# Altium PCB 1700-0003_PowerBoard_REV-A.PcbDoc (part 2 of 2)
Units mil, origin at the board's own origin, x right, y up, seen from the top; angles counter-clockwise.
Board outline 4000 x 3250 mil, 4 copper layers (Top, GND+Signal, PWR+Signal, Bottom), stack 69.687 mil thick; 205 components, 103 nets, 571 pads, 228 vias.
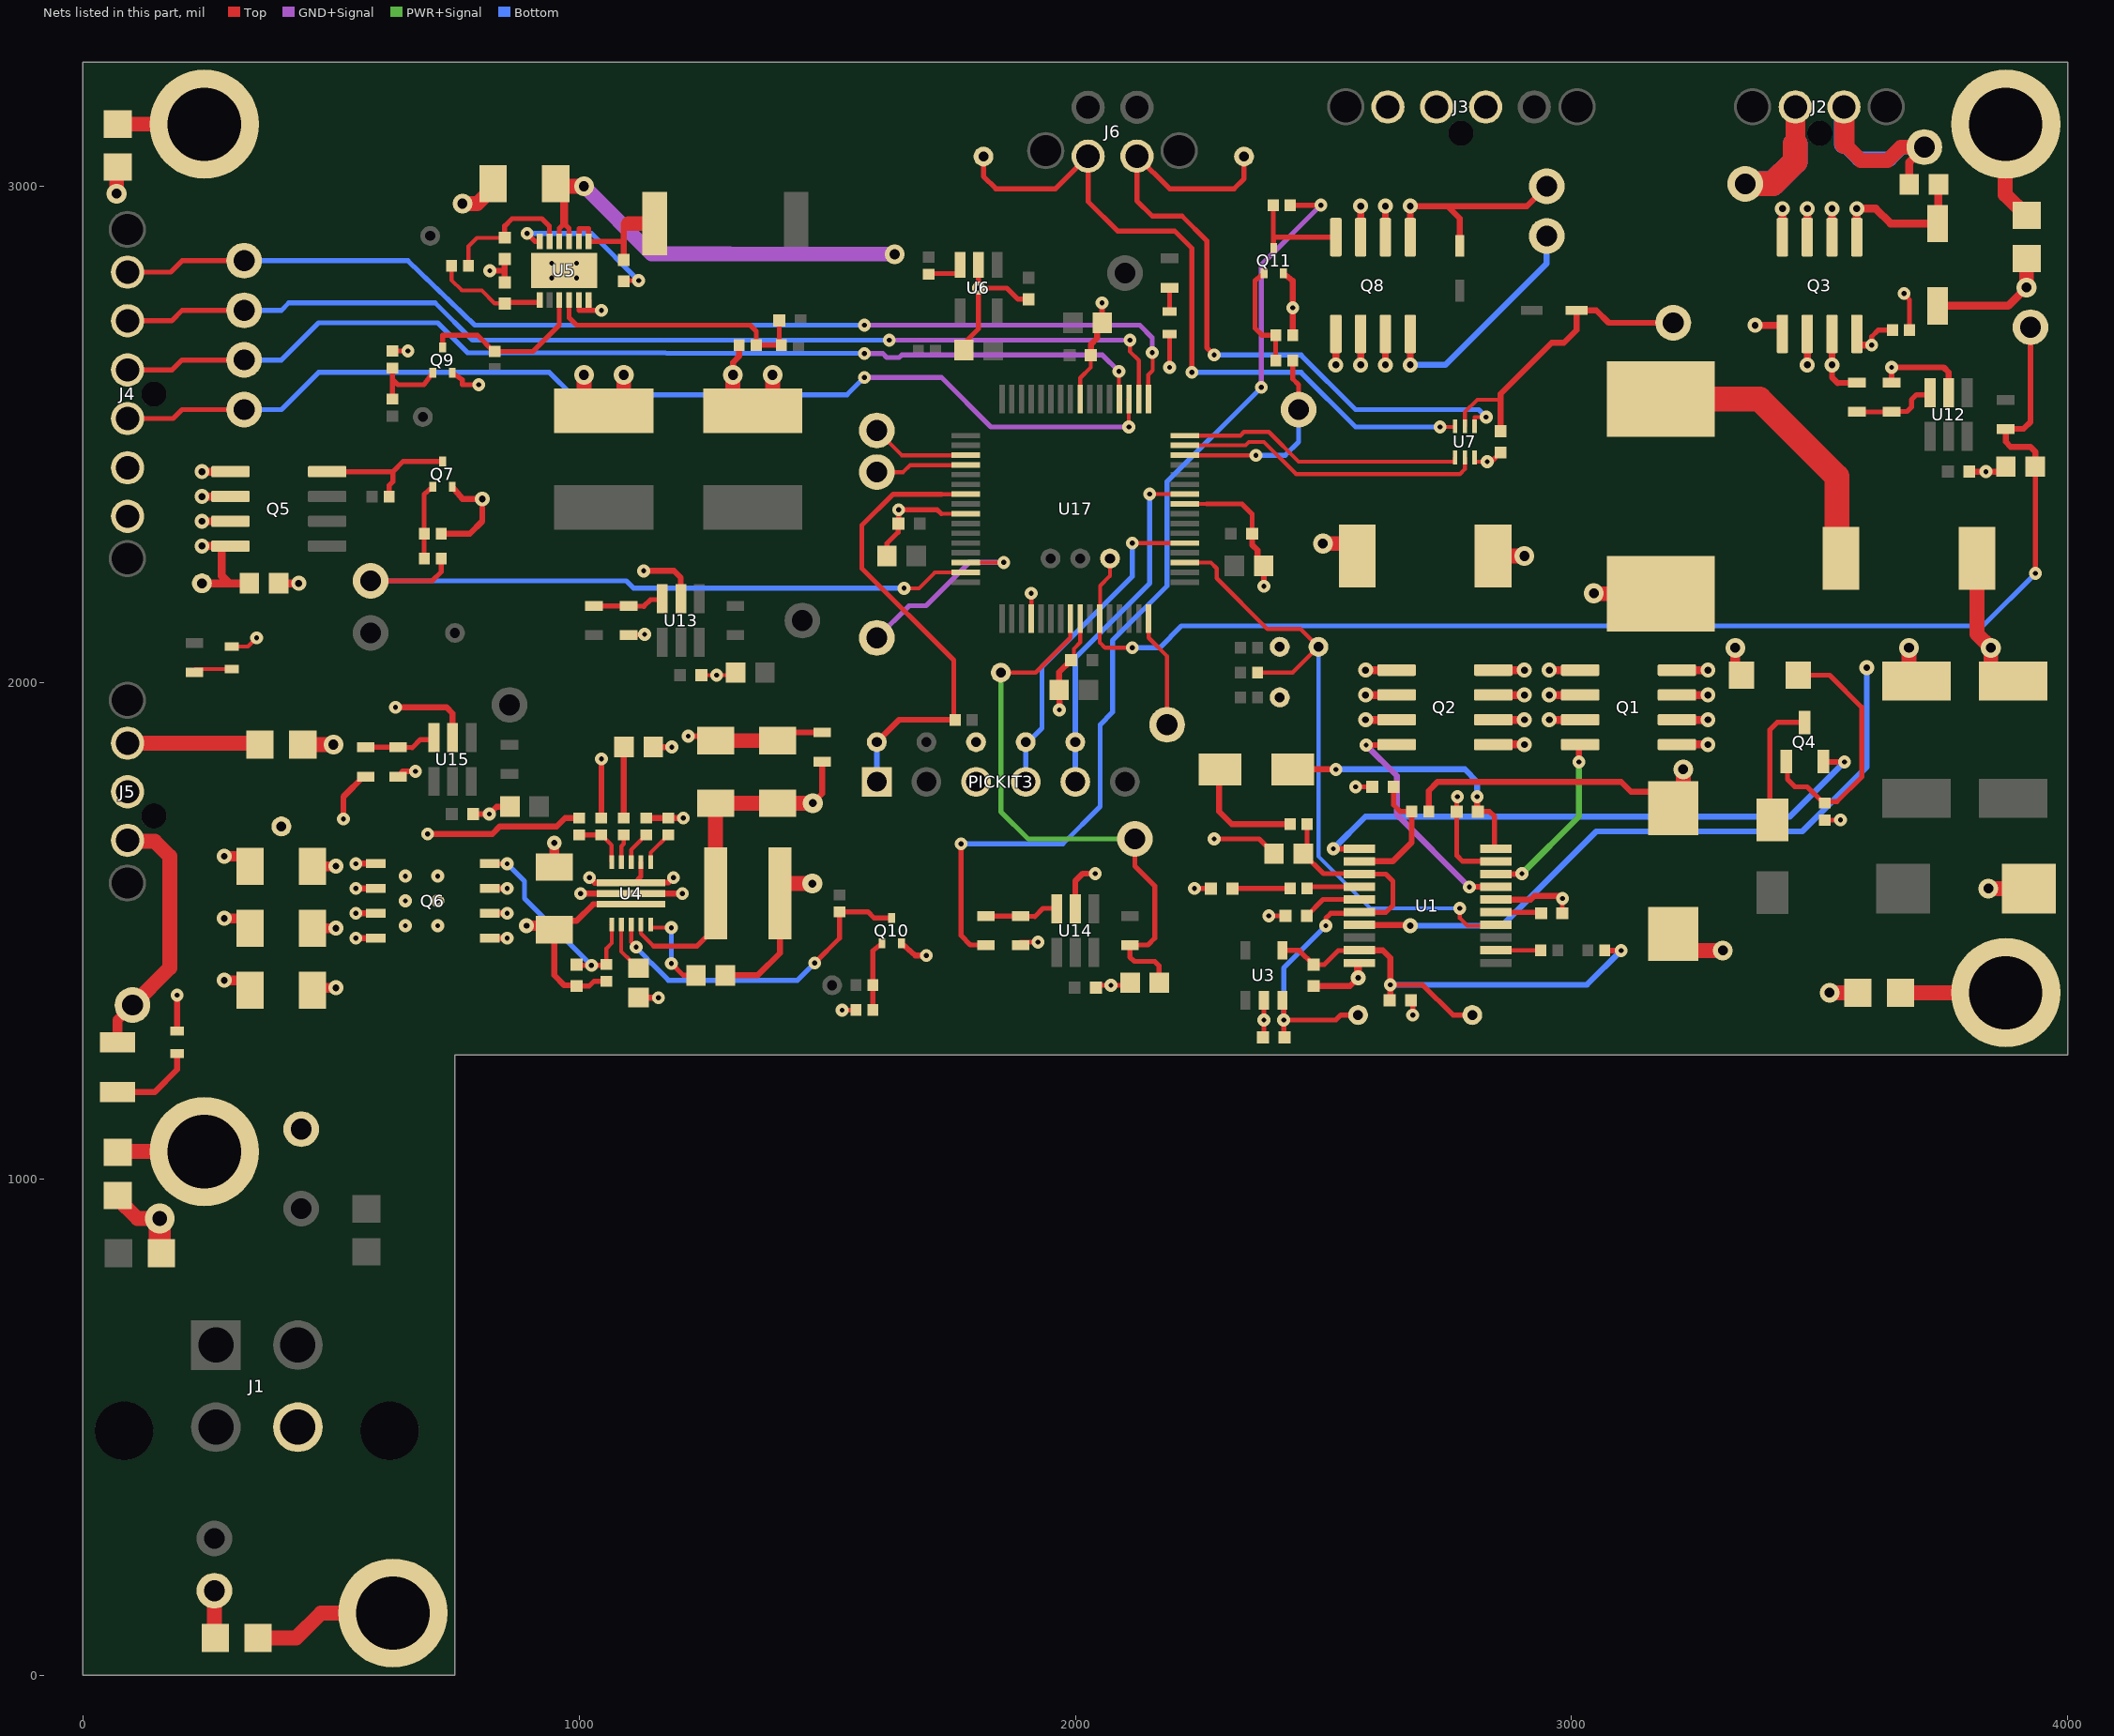
[diagram p4: the nets of this part, all layers, seen from the top]

## Via types
v1: diameter 26/26/26/26 (per signal layer), hole 10, Top to Bottom, 148 vias
v2: diameter 30/30/30/30 (per signal layer), hole 14, Top to Bottom, 45 vias
v3: diameter 40/36/36/40 (per signal layer), hole 20, Top to Bottom, 29 vias
v4: diameter 30/28/28/30 (per signal layer), hole 12, Top to Bottom, 3 vias
v5: diameter 40/32/32/40 (per signal layer), hole 16, Top to Bottom, 2 vias
v6: diameter 60/46/46/60 (per signal layer), hole 30, Top to Bottom, 1 vias

## Nets (pads, with @x,y where several pads share a name; then routed paths per layer and width w, separated by ;. In a path a pad name is that pad's centre, name@x,y a point inside that pad or via, vN(x,y) a via of type N, cw(c..) or ccw(c..) an arc to the next point about the centre after c; other vN are vias at no path point) (continued)
CHRGR_SDA: R3.2 SDA.P$2 U1.14 U17.35 | length 1345.6
  Top w8: U17.35@2221,2241.73 2273.27,2241.73 2285,2230 2285,2210 2387,2108 2454,2108 SDA.P$2@2490,2072 2438,2020 R3.2@2367.13,2020 ; v1(2775,1545) 2775,1525 2790,1510 2846.14,1510 U1.14@2847.75,1511.61
  Bottom w8: SDA.P$2@2490,2072 2490,1650 2595,1545 v1(2775,1545)
DCIN_MON: C42.1 DCIN2AD.P$1 DCINMON.P$1 R41.2 U17.27 | length 2716
  Top w8: DCIN2AD.P$1@2070,2250 2070,2215 2050,2195 2050,2129.79 U17.27@2049.21,2129 2049.21,2080.79 2060,2070 v1(2115,2070) ; C42.1@3934.53,2435 C42.1@3935,2434.53
  Top w10: v1(3935,2220) C42.1@3935,2434.53
  Top w12: DCINMON.P$1@3925,2716 3925,2525 3911.46,2511.46 R41.2@3875,2510.47 3875,2485 3885,2475 3925,2475 3935,2465 3935,2435.47 C42.1@3934.53,2435
  Bottom w10: v1(2115,2070) 2170,2070 2214,2114 3829,2114 v1(3935,2220)
DCIN_S: C17.1 C39.1 CR5.2 CR7.2 DCIN_S.P$1 Q1.5 Q1.6 Q1.7 Q1.8 Q3.1 Q3.2 Q3.3 R10.2 R20.2 R39.1 U7.5 | length 1975.9
  Top w8: U7.5@2785,2516.5 2785,2545 2810,2570 2852,2570 2857,2575
  Top w10: v1(3670,2784) 3681,2771 3681.13,2770.87 R10.2@3681.13,2710
  Top w12: R20.2@2712.13,1740 2712.13,1782.13 2730,1800 3100,1800 3120,1780 3171.77,1780 C17.1@3205,1746.77 ; C39.1@2857,2506.5 2857,2575 2857,2582 2960,2685 2985,2685 3010,2710 3010,2749.72 CR7.2@3010.28,2750 3050,2750 3075,2725 DCIN_S.P$1@3205,2725 ; v2(3525,2640) 3525,2615 3536.46,2603.54 R39.1@3575,2604.53
  Top w14: v2(3370,2720) 3425,2720 Q3.1@3425,2702.56 ; v2(3475,2640) Q3.2@3475,2702.56 ; v2(3525,2640) Q3.3@3525,2702.56
  Top w16: Q1.5@3212.44,1875 v2(3275,1875) ; Q1.6@3212.44,1925 v2(3275,1925) ; Q1.7@3212.44,1975 v2(3275,1975) ; Q1.8@3212.44,2025 v2(3275,2025)
  Top w20: C17.1@3205,1746.77 C17.1@3225,1746.77 ; v3(3330,2070) 3330,2015 CR5.2@3342.91,2015
  Top w30: C17.1@3225,1746.77 v3(3225,1825)
GND: 5VON.1 12VON.1 BATT-(GND).P$1 C1.2 C2.2 C3.2 C4.2 C5.2 C6.2 C7.2 C8.2 C9.2 C11.2 C12.2 C13.2 C15.2 C16.2 C17.2 C19.2 C20.2 C21.2 C23.2 C24.2 C25.2 C26.2 C27.2 C28.2 C30.2 C31.2 C33.2 C36.2 C39.2 C41.2 C42.2 C43.2 C44.2 C45.2 C46.2 C47.2 C48.2 C49.2 C50.2 C51.2 C52.2 C53.2 C77.2 C78.2 C79.2 CR2.1 GND.P$1 J1.4 J2.2 J3.2 J3.3 J4.2 J5.2 PICKIT3.3 PICKITGND.P$1 PICKITGND.P$2 PICPWR.1 Q2.1 Q2.2 Q2.3 Q3.4 Q7.2 Q9.2 Q10.2 Q11.2 R6.2 R7.2 R10.1 R11.2 R14.2 R19.1 R21.2 R22.2 R24.2 R25.1 R30.2 R37.1 R40.2 R43.2 R45.2 R48.2 R51.2 R52.2 R53.2 R54.2 R58.1 R61.1 THERM-.P$1 U1.10 U1.16 U3.2 U4.2 U4.6 U5.5 U5.6 U5.13 U6.2 U7.3 U12.2 U13.2 U14.2 U15.2 U17.9 U17.20 U17.25 U17.41 U17.56 | length 7753.1
  Top w8: 5VON.1@300,2072.75 332.75,2072.75 v1(350,2090) ; C44.2@1246.5,2015 v1(1277,2015) 1310.47,2015 C45.2@1315.47,2020 ; 1730,2340 1778.16,2340 U17.9@1779,2340.16 ; v1(1911,2180) 1911.42,2174.58 U17.20@1911.42,2129 ; C78.2@1991.5,2045 1997,2055.5 1997,2068 2010,2081 2010,2128.84 U17.25@2009.84,2129 ; U17.56@2009.84,2571 2009.84,2613.84 2031,2635 2031,2659.5 C52.2@2031.5,2660 ; U17.41@2221,2359.84 2221.16,2360 2265,2360 ; U7.3@2804.69,2453.5 2804.69,2445 v1(2830,2445) ; C39.2@2857,2462 C39.2@2857,2463.5
  Top w10: C23.2@337.01,1630 C23.2@337.87,1630.87 ; R58.1@624,2668.13 623.87,2668.13 v1(655,2668) ; Q9.2@744.5,2624.5 765,2610 765,2600 v1(798,2600) ; U5.5@999.53,2770.94 999.53,2750 1020,2750 ; U5.6@1019.21,2770.94 1020,2770.94 1020,2750 ; v1(1045,2750) 1020,2750 ; R43.2@1100,2095.47 1131.46,2096.46 v1(1132,2097) ; U4.6@1105,1596.65 1113,1596.65 1113,1597 1124.68,1609 1124.68,1616.34 U4.2@1124.69,1637.99 ; C5.2@1400,1882.99 C5.2@1416.54,1899.53 ; v1(1530,1340) R61.1@1557.87,1340 ; C51.2@1620.47,2255 1620.47,2280.47 1643,2303 1643,2319.5 C50.2@1643.5,2320 1644,2320.5 v1(1644,2348) 1722,2348 1730,2340 ; C4.2@1775.47,2670 1775.47,2683.47 1805,2713 v1(1805,2795) ; U6.2@1805,2842 v1(1805,2795) ; R45.2@1890,1470.47 1890,1477 v1(1925,1477) ; C36.2@1906,2772.5 1884.5,2772.5 1862,2795 v1(1805,2795) ; C46.2@2041.5,1385 2041.5,1390 v1(2072,1390) 2111,1390 2111,1395 C47.2@2110.47,1395 ; v1(2190,2635) PICPWR.1@2190,2702.25 ; v1(2240,1585) C11.2@2273.5,1585 ; 2265,2360 2336,2360 2356.5,2339.5 C26.2@2356.5,2300 ; v1(2280,1685) 2370.47,1685 C13.2@2400.47,1655 ; C15.2@2378.5,1285 2380,1285 v1(2380,1320) U3.2@2380,1359.75 ; v1(2390,1530) 2425,1530 2425,1528.5 C9.2@2423.5,1530 ; v1(2565,1790) C19.2@2598.5,1790 ; U1.10@2570,1434.84 U1.10@2572.25,1434.84 ; C8.2@2676.5,1360 2680,1356.5 v1(2680,1330) ; v1(2830,2445) 2838.5,2445 C39.2@2857,2463.5 ; C12.2@2981.5,1535 2981.5,1563.5 v1(2982,1565) ; R21.2@3510,1722.87 3540,1722.87 v1(3542,1723) ; v1(3605,2680) 3605,2697 3618,2710 R10.1@3646.87,2710
  Top w12: 12VON.1@190,1297.75 v1(190,1370) ; v1(630,1950) 733,1950 745,1938 U15.2@745,1889 ; R48.2@635,1810.47 644.54,1821 v1(670,1821) ; R37.1@722.13,2300 780,2300 805,2325 v2(805,2370) 765,2370 Q7.2@744.5,2394.5 ; C48.2@786.5,1735 v1(819,1735) 834,1750 C49.2@860.47,1750 ; v1(820,2830) 850,2830 ; C27.2@850,2806.5 850,2830 ; C28.2@850,2853.5 850,2830 ; v1(1021,1607) 1031.35,1596.65 U4.6@1105,1596.65 1105,1597 1180,1597 v1(1190,1607) ; R22.2@1045,1727.13 v1(1045,1846) ; C2.2@1120,1365.47 1120.47,1365 v1(1160,1365) ; v1(1130,2225) 1191,2225 1205,2211 U13.2@1205,2169 ; C1.2@1149.53,1870 v1(1187,1870) ; R11.2@1180,1727.13 R6.2@1135,1727.13 v1(1210,1727) ; v1(1220,1892) 1262.01,1892 1262.01,1870 C3.2@1275,1882.99 ; v3(1310,2620) 1310,2645 1322.87,2657.87 R24.2@1322.87,2680 ; C5.2@1416.54,1899.53 R30.2@1490,1899.53 ; Q10.2@1649.5,1474.5 1677.5,1450 v1(1700,1450) ; v1(1968,1945) 1968,1962 1968.53,1984.47 C79.2@1967.47,1985 1967.47,2020.97 C78.2@1991.5,2045 ; U14.2@2000,1544 2000,1600 2015,1615 v1(2040,1615) ; C52.2@2031.5,2660 2031.5,2681.5 2044,2694 2044,2714.47 C53.2@2054.53,2725 2054,2725 v1(2054,2765) ; C26.2@2356.5,2300 2356.5,2277.5 2367,2267 2367,2247.53 C77.2@2379.53,2235 2380,2235 v1(2380,2194) ; Q11.2@2419.5,2824.5 2438,2810 v1(2438,2755) 2438,2700 R25.1@2438.13,2700 ; C16.2@2480,1388.5 2553.5,1388.5 v4(2570,1405) ; U1.16@2847.75,1562.8 2917.8,1562.8 2925,1570 2977,1570 v1(2982,1565) ; R40.2@3645,2604.53 v1(3645,2635) 3750,2635 3760,2625 U12.2@3760,2584 ; C41.2@3801.5,2425 v1(3835,2425) 3865.47,2425 C42.2@3875.47,2435
  Top w14: Q3.4@3575,2680 v1(3605,2680)
  Top w16: C43.2@394.53,2200 v2(435,2200) ; v4(2570,1405) U1.10@2570,1434.84 ; v2(2585,1925) Q2.3@2647.56,1925 ; v2(2585,1975) Q2.2@2647.56,1975 ; v2(2585,2025) Q2.1@2647.56,2025 ; Q3.4@3575,2680 Q3.4@3575,2702.56 ; C7.2@3680.47,3004 3680.47,3048.47 GND.P$1@3711,3079 ; C6.2@3738,2759 3880,2759 v3(3917,2796)
  Top w20: v2(285,1400) 317.01,1400 C25.2@337.01,1380 ; v2(285,1525) 317.01,1525 C24.2@337.01,1505 ; v2(285,1650) 317.01,1650 C23.2@337.01,1630 ; v1(945,2815) 960,2830 U5.13@970,2830 ; C21.2@950,1627.99 v4(950,1677)
  Top w30: v3(68,2985) 68,3039 R7.2@70,3038.69 ; R52.2@70,966.69 70,960 110,920 v6(155,920) ; THERM-.P$1@265,170 265,101 R53.2@266.69,75 ; R54.2@443.31,1875 v3(505,1875) ; v3(765,2965) 795,2965 827.01,2997.01 C33.2@827.01,3005 ; C30.2@1050,2547.5 1010,2547.5 v3(1010,2620) 1010,2540 1090,2540 v3(1090,2620) ; C3.2@1275,1882.99 C5.2@1400,1882.99 ; v3(1310,2620) 1310,2547.5 C31.2@1350,2547.5 1390,2547.5 v3(1390,2620) ; v3(2499,2280) 2567,2280 2568,2279 CR2.1@2568,2255 ; C17.2@3205,1493.23 3205,1460 v3(3305,1460) ; v3(3520,1375) R51.2@3576.69,1375 ; 3550,3085 3583,3052 3637,3052 3664,3079 GND.P$1@3711,3079 ; v3(3840,1585) C20.2@3921.77,1585 ; v3(3917,2796) R14.2@3917,2854.69
  Top w40: 3550,3085 J2.2@3550,3160
  Top w45: v6(155,920) 155,850 R19.1@158.31,850
  Bottom w30: 3549,3085 3579,3055 3641,3055 3664,3078 GND.P$1@3711,3079
  Bottom w40: 3549,3085 J2.2@3549,3160
  other v1: 995,2815 945,2845 995,2845
IB_PWR_5V: 5VIB.P$1 C43.1 J4.1 Q5.5 Q5.6 Q5.7 Q5.8 | length 429.5
  Top w16: 5VIB.P$1@240,2200 300,2200 ; v2(240,2275) Q5.8@297.56,2275 280,2275 280,2215 295,2200 300,2200 ; v2(240,2325) Q5.7@297.56,2325 ; v2(240,2375) Q5.6@297.56,2375 ; v2(240,2425) Q5.5@297.56,2425 ; C43.1@335.47,2200 300,2200
IB_PWR_EN: IBPWREN.P$1 R38.1 U17.15 | length 1395
  Top w8: v1(1655,2190) 1685,2190 1717,2222 1776.95,2222 U17.15@1779,2222.05
  Top w10: IBPWREN.P$1@580,2205 704,2205 722.13,2223.13 R38.1@722.13,2250
  Bottom w10: IBPWREN.P$1@580,2205 1095,2205 1110,2190 v1(1655,2190)
IB_SPI_!SS: !SPI_SS!.P$1 !SPI_SS!.P$2 J4.6 U17.49 | length 2265.7
  Top w8: U17.49@2147,2571.64 2147,2620 2156,2629 v1@2156,2664
  Top w10: J4.6@90,2827 177,2827 200,2850 !SPI_SS!.P$2@325,2850 ; U17.49@2147,2571.64 U17.49@2147.64,2571 ; v1(2155,2665) v1@2156,2664
  GND+Signal w10: v1(1575,2720) 2130,2720 2155,2695 v1(2155,2665)
  Bottom w10: !SPI_SS!.P$2@325,2850 655,2850 790,2720 v1(1575,2720)
IB_SPI_MISO: J4.4 MISO.P$1 MISO.P$2 U17.52 | length 2137.5
  Top w8: v1(2088,2627) 2088,2571.58 U17.52@2088.58,2571
  Top w10: J4.4@90,2630 180,2630 200,2650 MISO.P$2@325,2650
  GND+Signal w10: v1(1575,2663) 1612,2663 1620,2655 1645,2655 1650,2660 2055,2660 v1(2088,2627)
  Bottom w10: MISO.P$2@325,2650 400,2650 475,2725 715,2725 775,2665 v1(1575,2663)
IB_SPI_MOSI: J4.3 MOSI.P$1 MOSI.P$2 U17.51 | length 2187.2
  Top w8: v1(2108,2515) U17.51@2108,2570.73
  Top w10: J4.3@90,2532 182,2532 200,2550 MOSI.P$2@325,2550 ; U17.51@2108,2570.73 U17.51@2108.27,2571
  GND+Signal w10: v1(1575,2615) 1730,2615 1830,2515 v1(2108,2515)
  Bottom w10: MOSI.P$2@325,2550 400,2550 475,2625 940,2625 985,2580 1540,2580 v1(1575,2615)
IB_SPI_SCLK: J4.5 SPI_CLK.P$1 SPI_CLK.P$2 U17.50 | length 2192.5
  Top w8: v1(2110,2690) 2110,2667 2128,2649 U17.50@2127.95,2571 U17.50@2127.95,2571
  Top w10: J4.5@90,2729 179,2729 200,2750 SPI_CLK.P$2@325,2750
  GND+Signal w10: v1(1625,2690) v1(2110,2690)
  Bottom w10: SPI_CLK.P$2@325,2750 400,2750 415,2765 710,2765 785,2690 v1(1625,2690)
L1_OUT: C14.1 L1.1 U4.7 | length 643.5
  Top w10: L1.1@1405,1575 L1.1@1406,1574
  Top w12: v1(1003,1575) v1(1208,1575) U4.7@1105,1575 ; C14.1@1294.53,1410 1360,1410 1405,1455 L1.1@1405,1575
  Top w30: L1.1@1406,1595 v5(1470,1595)
  Top w32: L1.1@1406,1574 L1.1@1406,1595
LED_BLK_LEAD: J6.2 LEDBLK.P$1 U7.4 | length 1438.4
  Top w8: U7.4@2804.69,2516.5 2804.69,2535 v1(2828,2535)
  Top w10: v1(2280,2660) 2265,2675 2265,2890 2215,2940 2155,2940 2124.21,2970.79 J6.2@2124.21,3060.79 2190,2995 2320,2995 2340,3015 LEDBLK.P$1@2340,3060
  Bottom w10: v1(2280,2660) 2455,2660 2565,2550 2813,2550 v1(2828,2535)
LED_RED_LEAD: J6.1 LEDRED.P$1 U7.6 | length 1454.7
  Top w8: v1(2735,2515) 2763.82,2515 U7.6@2765.31,2516.5
  Top w10: LEDRED.P$1@1815,3060 1815,3020 1840,2995 1960,2995 J6.1@2025.79,3060.79 2025.79,2969.21 2085,2910 2200,2910 2235,2875 v1(2235,2625)
  Bottom w10: v1(2235,2625) 2455,2625 2565,2515 v1(2735,2515)
N$1: R5.1 U4.4 | length 56.8
  Top w8: U4.4@1085.31,1637.99 1085.32,1670.32 1090,1675 R5.1@1090,1692.87
N$2: C19.1 R20.1 U1.2 | length 262.1
  Top w10: U1.2@2572.25,1639.57 U1.2@2572.68,1640 ; C19.1@2641.5,1790 2641.5,1753.5 2655,1740 R20.1@2677.87,1740
  Top w12: U1.2@2572.68,1640 2640,1640 2677.87,1677.87 R20.1@2677.87,1740
N$3: Q1.4 U1.18 | length 361.4
  Top w12: U1.18@2847.75,1613.98 2898.98,1613.98 v1(2900,1615) ; v1(3015,1840) 3015,1872.44 Q1.4@3017.56,1875
  PWR+Signal w12: v1(2900,1615) 3015,1730 v1(3015,1840)
N$4: C1.1 R5.2 | length 143.1
  Top w12: R5.2@1090,1727.13 1090,1869.53 C1.1@1090.47,1870
N$5: R4.2 U1.12 | length 90.3
  Top w8: U1.12@2847.75,1460.43 R4.2@2937.44,1460.43
  Top w10: R4.2@2937.44,1460.43 R4.2@2937.87,1460
N$6: R6.1 U4.3 | length 67.3
  Top w8: U4.3@1105,1637.99 1105,1662.87 R6.1@1135,1692.87
N$7: C2.1 U4.10 | length 102.9
  Top w8: U4.10@1085.31,1512.01 1085,1511.32 1085,1458 1105,1438 1106.53,1438 C2.1@1120,1424.53
N$8: R11.1 U4.1 | length 69.6
  Top w8: U4.1@1144.37,1637.99 1144.37,1657.24 R11.1@1180,1692.87
N$9: RG0.P$1 U17.3 | length 199.8
  Top w8: RG0.P$1@1600,2508 1650,2458 1778.73,2458 U17.3@1779,2458.27
N$10: C9.1 U1.5 | length 119.3
  Top w10: C9.1@2466.5,1530 2499.3,1562.8 U1.5@2572.25,1562.8
N$11: R8.2 U1.4 | length 106.5
  Top w10: R8.2@2467.13,1585 2470.51,1588.39 U1.4@2572.25,1588.39
N$12: C11.1 R8.1 | length 116.4
  Top w10: C11.1@2316.5,1585 R8.1@2432.87,1585
N$13: C12.1 U1.15 | length 91.7
  Top w10: U1.15@2847.75,1537.2 C12.1@2936.3,1537.2
  Top w12: C12.1@2936.3,1537.2 C12.1@2938.5,1535
N$14: CR4.2 Q4.3 | length 260.4
  Top w10: CR4.2@3405,1723.12 3400,1728.12 3400,1905 3415,1920 3469.37,1920 Q4.3@3470,1919.37
N$15: CR1.2 R16.2 | length 239
  Top w10: CR1.2@2290,1823.12 CR1.2@2291.88,1825
  Top w12: CR1.2@2290,1823.12 2290,1740 2315,1715 R16.2@2432.87,1715
N$16: Q2.4 U1.17 | length 489.6
  Top w12: v1(2586,1874) 2646,1874 2646.56,1876 Q2.4@2647.56,1875 ; v1(2794,1588) 2794.39,1588.39 U1.17@2847.75,1588.39
  GND+Signal w12: v1(2586,1874) 2648,1812 2648,1734 v1(2794,1588)
N$17: C18.1 CR1.1 U1.20 | length 546.5
  Top w10: C18.1@2811.5,1740 2835,1740 2845,1730 2845,1667.91 U1.20@2847.75,1665.16
  Top w12: CR1.1@2438.12,1825 v1(2525,1825) ; v1(2810,1770) 2810,1741.5 C18.1@2811.5,1740
  Bottom w12: v1(2525,1825) 2785,1825 2810,1800 v1(2810,1770)
N$18: CR3.1 L2.2 | length 587.9
  Top w50: L2.2@3180,2571 3379,2571 3535,2415 3535,2258 CR3.1@3543,2250
N$19: C14.2 U4.13 | length 179.1
  Top w8: U4.13@1144.37,1512.01 1144.37,1506 v1(1186,1506)
  Top w10: v1(1186,1434) 1210,1410 C14.2@1235.47,1410
  Bottom w10: v1(1186,1434) v1(1186,1506)
N$20: C22.2 Q6.4 R12.2 U4.9 | length 456.5
  Top w8: R12.2@1054.37,1431.5 R12.2@1055,1432.13 1055,1464 1066,1475 1066,1511.64 U4.9@1065.63,1512.01
  Top w10: Q6.4@820,1635 v1(855,1635) ; C22.2@995,1431.5 996.5,1430 v1(1025,1430) 1052.87,1430 R12.2@1054.37,1431.5
  Bottom w10: v1(855,1635) 890,1600 890,1565 v1(1025,1430)
N$21: CR5.1 Q4.1 R21.1 | length 523.2
  Top w10: Q4.1@3432.6,1840.63 3435,1838.23 3435,1805 3450,1790 3475,1790 3507.87,1757.13 R21.1@3510,1757.13 3512.87,1760 3535,1760 3585,1810 3585,1950 3520,2015 CR5.1@3457.09,2015
N$22: Q8.4 Q11.3 R27.1 | length 233.5
  Top w10: R27.1@2398.87,2962 2398.87,2890 Q11.3@2400,2875.5 2400,2897.44 Q8.4@2525,2897.44
N$23: C27.1 R31.2 U5.1 | length 235.1
  Top w8: R31.2@742.87,2840 742.87,2811.13 764,2790 804,2790 830,2764 849.5,2764 C27.1@850,2763.5
  Top w10: C27.1@850,2763.5 850,2765.94 920,2765.94 920,2765 U5.1@920.79,2770.94
N$24: R13.2 R22.1 U4.5 | length 108.4
  Top w8: R22.1@1045,1692.87 1065.63,1672.24 U4.5@1065.63,1637.99
  Top w10: R13.2@1000,1692.87 R22.1@1045,1692.87
N$25: SCL.P$1
N$27: !INT!.P$1
N$28: C32.2 U5.12 | length 327.4
  Top w10: v1(895,2905) 910.94,2889.06 U5.12@920.79,2889.06 ; C32.2@1090,2808.5 1091.5,2810 v1(1120,2810)
  Bottom w10: v1(895,2905) 1025,2905 v1(1120,2810)
N$29: C29.2 R23.2 R24.1 U5.4 | length 554.8
  Top w10: U5.4@979.84,2770.94 980,2770.79 980,2735 995,2720 1345,2720 1357.13,2707.87 R24.1@1357.13,2680 R23.2@1407.87,2680 ; R23.2@1403.5,2684.37 C29.2@1403.5,2730
  Top w12: R23.2@1403.5,2684.37 R23.2@1407.87,2680
N$30: 5VON.2 R56.1 | length 81.8
  Top w8: R56.1@225,2020.47 225,2027.25 5VON.2@300,2027.25
N$31: SDA.P$1
N$32: R35.1 U6.3 | length 81.7
  Top w10: R35.1@1705,2822.87 1705,2824 1767.6,2824 U6.3@1767.6,2842
N$33: Q11.1 R25.2 R28.2 | length 218
  Top w10: Q11.1@2380.5,2824.5 2362,2809.5 2362,2714 2376,2700 R25.2@2403.87,2700 R28.2@2403.87,2649
N$37: RG1.P$1 U17.4 | length 184.9
  Top w8: RG1.P$1@1600,2424 1653,2424 1667,2438 1777.58,2438 U17.4@1779,2438.58
N$38: RF4.P$1 U17.14 | length 396.1
  Top w8: U17.14@1779,2241.73 1779.27,2242 v1(1856,2242)
  GND+Signal w10: RF4.P$1@1600,2090 1665,2155 1699,2155 1786,2242 v1(1856,2242)
N$40: Q5.4 Q7.3 R36.1 | length 294.3
  Top w10: Q5.4@492.44,2425 625,2425 ; R36.1@617.13,2375 617.13,2397.13 625,2405 625,2425 ; Q7.3@725,2445.5 645.5,2445.5 625,2425
N$41: Q7.1 R37.2 R38.2 | length 152.7
  Top w10: R38.2@687.87,2250 R37.2@687.87,2300 687.87,2379.63 Q7.1@705.5,2394.5
N$42: R39.2 R40.1 U12.3 | length 172
  Top w10: R39.2@3575,2545.47 R40.1@3645,2545.47 3676.46,2546.46 3685,2555 3685,2570 3695,2580 3718.6,2580 U12.3@3722.6,2584
N$43: R42.2 R43.1 U13.3 | length 144
  Top w10: R42.2@1030,2154.53 R43.1@1100,2154.53 1130.54,2153.54 1144,2167 1165.6,2167 U13.3@1167.6,2169
N$44: R45.1 R46.2 U14.3 | length 149.8
  Top w10: R46.2@1820,1529.53 R45.1@1890,1529.53 1918.54,1528.54 1935,1545 1961.6,1545 U14.3@1962.6,1544
N$45: R48.1 R49.2 U15.3 | length 146.1
  Top w10: R49.2@570,1869.53 R48.1@635,1869.53 663.54,1868.54 680,1885 703.6,1885 U15.3@707.6,1889
N$46: RC7.P$1 U17.32 | length 229.5
  Top w8: U17.32@2147.64,2129 2148,2128.64 2148,2090 2185,2053 RC7.P$1@2185,1915
N$58: PTH1.P$1 R7.1 | length 175
  Top w30: R7.1@70,3125.31 PTH1.P$1@245,3125
N$59: PTH2.P$1 R14.1 | length 201.8
  Top w30: PTH2.P$1@3875,3125 3874,3000 3874,2983.31 R14.1@3917,2941.31
N$60: PTH3.P$1 R51.1 | length 211.7
  Top w30: R51.1@3663.31,1375 PTH3.P$1@3875,1375
N$61: PTH4.P$1 R52.1 | length 176.7
  Top w30: R52.1@70,1053.31 70,1055 PTH4.P$1@245,1055
N$62: PTH5.P$1 R53.1 | length 292.4
  Top w30: R53.1@353.31,75 430,75 480,125 PTH5.P$1@625,125
N$63: 12VON.2 R55.2 | length 170.9
  Top w12: R55.2@70,1175 145,1175 190,1220 12VON.2@190,1252.25
N$64: PICPWR.2 R26.1 | length 47.7
  Top w10: PICPWR.2@2190,2747.75 R26.1@2190,2795.47
N$65: Q9.1 R58.2 R60.2 | length 184.1
  Top w10: R60.2@624,2571.13 R58.2@624,2633.87 624,2611 635,2600 687.5,2600 Q9.1@705.5,2624.5
N$66: Q9.3 R59.1 U5.3 | length 346
  Top w10: Q9.3@725,2675.5 725,2700 795,2700 827.87,2667.13 R59.1@830,2667.13 907.13,2667.13 960,2720 960,2770.79 U5.3@960.16,2770.94
N$67: Q10.3 R62.1 U4.11 | length 688
  Top w8: U4.11@1105,1512.01 1105,1477 v1(1115,1467)
  Top w10: v1(1475,1435) 1525,1485 R62.1@1525,1537.87 ; R62.1@1525,1540 R62.1@1525,1537.87 ; Q10.3@1630,1525.5 1594.5,1525.5 1582,1538 1525.13,1538 R62.1@1525,1537.87
  Bottom w10: v1(1115,1467) 1145,1435 1180,1400 1440,1400 v1(1475,1435)
N$68: Q10.1 R61.2 R63.2 | length 143.3
  Top w10: R61.2@1592.13,1340 R63.2@1592.13,1390 1592.13,1459.63 Q10.1@1610.5,1474.5
PC_PWR_12V: 12V.P$1 12VTP.P$1 C23.1 C24.1 C25.1 J5.1 Q6.5 Q6.6 Q6.7 Q6.8 R13.1 R49.1 R55.1 | length 1256.1
  Top w10: C23.1@462.13,1630 C23.1@462.99,1630
  Top w12: v1(525,1725) 525,1770 566.46,1811.46 R49.1@570,1810.47 ; v1(550,1485) Q6.8@590,1485 ; v1(550,1535) Q6.7@590,1535 ; v1(550,1585) Q6.6@590,1585 ; v1(550,1635) Q6.5@590,1635 ; v1(695,1695) 825,1695 840,1710 955,1710 972.13,1727.13 R13.1@1000,1727.13
  Top w20: R55.1@70,1275 70,1320 12V.P$1@100,1350 ; C23.1@462.13,1630 v2(510,1630) ; C25.1@462.99,1380 460,1380 460,1385 v2(510,1385) ; C24.1@462.99,1505 v2(510,1505)
  Top w30: J5.1@90,1682 92,1680 145,1680 175,1650 175,1425 12V.P$1@100,1350
  other v1: 650,1510 715,1510 650,1560 715,1560 650,1610 715,1610
PC_PWR_CHASSIS: J5.3 R54.1 | length 270.3
  Top w30: J5.3@90,1878 357,1878 357,1875 R54.1@356.69,1875
PHASE1-2: C32.1 L3.2 U5.7 U5.8 | length 312.2
  Top w10: U5.8@999.53,2889.06 1000,2889.06 1000,2915 1019.21,2915 U5.7@1019.21,2889.06 1090,2889.06 C32.1@1090,2855
  Top w12: C32.1@1090,2851.5 1090,2855 1090,2925 1100,2925
  Top w30: 1100,2925 L3.2@1152.25,2925
PICKIT3_PGC: PICKIT3.5 PICPGC.P$1 PICPGC.P$2 U17.42 | length 713.3
  Top w8: v1(2150,2380) 2220.53,2380 U17.42@2221,2379.53
  Bottom w10: 2000,2050 2150,2200 v1(2150,2380)
  Bottom w12: PICKIT3.5@2000,1800 PICPGC.P$2@2000,1880 2000,2050
PICKIT3_PGD: PICKIT3.4 PICPGD.P$1 PICPGD.P$2 U17.37 | length 676.1
  Top w8: v1(2115,2281) 2219.9,2281 U17.37@2221,2281.1
  Bottom w10: PICKIT3.4@1900,1800 1900,1875 1933,1908 1933,2032 2115,2214 v1(2115,2281)
PSW_MON: C47.1 PSW2AD.P$1 PSWMON.P$1 R47.2 U17.24 | length 1177.2
  Top w8: PSW2AD.P$1@1850,2020 1920,2020 1990,2090 1990,2128.84 U17.24@1990.16,2129
  Top w10: PSWMON.P$1@2120,1685 2120,1630 2160,1590 2160,1485 2146.46,1471.46 R47.2@2110,1470.47 2110,1447 2119,1438 2160,1438 2169,1429 2169,1395.53 C47.1@2169.53,1395
  PWR+Signal w10: PSW2AD.P$1@1850,2020 1850,1740 1905,1685 PSWMON.P$1@2120,1685
PSW_OUT: CR6.2 J3.1 PSWOUT.P$1 Q8.1 Q8.2 Q8.3 R27.2 R46.1 | length 2581.3
  Top w10: v1(1770,1675) 1770,1490 1788.54,1471.46 R46.1@1820,1470.47 ; R27.2@2433.13,2962 v1(2495,2962)
  Top w12: v2(2675,2960) 2750,2960 ; CR6.2@2775,2880.28 2775,2935 2750,2960 ; PSWOUT.P$1@2950,3000 2910,2960 2750,2960
  Top w14: Q8.3@2575,2897.44 v2(2575,2960) ; Q8.2@2625,2897.44 v2(2625,2960) ; Q8.1@2675,2897.44 v2(2675,2960)
  GND+Signal w10: v1(2375,2595) 2375,2842 v1(2495,2962)
  Bottom w10: v1(1770,1675) 1975,1675 2050,1750 2050,1915 2075,1940 2075,2085 2185,2195 2185,2405 v1(2375,2595)
REF_4.096V: C8.1 C16.1 R9.1 U1.9 U1REF.P$1 U3.4 | length 1049.8
  Top w10: U3.4@2417.4,1460.25 2451.25,1460.25 C16.1@2480,1431.5 2501.5,1431.5 2530,1460 2571.82,1460 U1.9@2572.25,1460.43 ; C8.1@2633.5,1360 C8.1@2635,1366.5 ; v1(2635,1391) 2700,1391 2761,1330 U1REF.P$1@2800,1330
  Top w12: U1.9@2572.25,1460.43 2619.57,1460.43 2635,1445 v1(2635,1391) C8.1@2635,1366.5 ; R9.1@3067.13,1460 v1(3100,1460)
  Bottom w12: v1(2635,1391) 3031,1391 v1(3100,1460)
STAT_LED_!RED!/GRN: U7.2 U17.47 | length 621.5
  Top w8: U17.47@2221,2477.95 2342.95,2477.95 2350,2485 2380,2485 2445,2420 2775,2420 2785,2430 U7.2@2785,2453.5
STAT_LED_RED/!GRN!: U7.1 U17.48 | length 580.7
  Top w8: U17.48@2221,2497.64 2332.64,2497.64 2340,2505 2390,2505 2450,2445 2765.32,2445 U7.1@2765.31,2453.5
U1_CS: CR3.2 R17.1 R18.1 U1.7 | length 1741.3
  Top w12: U1.7@2572.25,1511.61 2673.39,1511.61 v2(2675,1510)
  Top w30: v3(3680,2070) 3680,2003.11 R17.1@3695,2003.11 ; CR3.2@3817,2250 3817,2098 v3(3845,2070) 3845,2003.11 R18.1@3890,2003.11
  Bottom w12: v2(2675,1510) 2860,1510 3050,1700 3465,1700 3595,1830 v2(3595,2030)
U1_IOUT: Q4.2 U1.1 | length 1207.7
  Top w12: v1(2520,1665) 2515.16,1665.16 U1.1@2572.25,1665.16 ; Q4.2@3507.4,1840.63 3507.4,1840 v1(3550,1840)
  Bottom w12: v1(2520,1665) 2585,1730 3440,1730 v1(3550,1840)
U1_LX: C18.2 CR2.2 L2.1 Q1.1 Q1.2 Q1.3 Q2.5 Q2.6 Q2.7 Q2.8 U1.19 | length 840.2
  Top w10: v1(2770,1770) 2768.5,1768.5 C18.2@2768.5,1740 2768.5,1651.5 2780,1640 2847.32,1640 U1.19@2847.75,1639.57
  Top w16: Q2.5@2842.44,1875 v2(2905,1875) ; Q2.6@2842.44,1925 v2(2905,1925) ; Q2.7@2842.44,1975 v2(2905,1975) ; Q2.8@2842.44,2025 v2(2905,2025) ; v2(2955,1925) Q1.3@3017.56,1925 ; v2(2955,1975) Q1.2@3017.56,1975 ; v2(2955,2025) Q1.1@3017.56,2025
  Top w30: CR2.2@2842,2255 v3(2905,2255) ; v3(3045,2180) 3045,2179 L2.1@3180,2179
U1_VL: C13.1 C15.1 R16.1 U1.3 U1.6 U1VL.P$1 U3.3 | length 934.8
  Top w10: U3.3@2418,1359.75 U3.3@2417.4,1359.75 2420,1357.15 v1(2420,1320) ; C15.1@2421.5,1285 2420,1284 v1(2420,1320) ; R16.1@2467.13,1715 2467.13,1662.6 C13.1@2459.53,1655 2460,1655 2500,1615 2571.23,1615 U1.3@2572.25,1613.98 2626.02,1613.98 2640,1600 2640,1551 2626,1537 2576.05,1537 U1.6@2572.25,1537.2 2570.05,1535 2515,1535 2505,1525 v1(2505,1510) ; U1VL.P$1@2570,1330 2535,1330 2525,1320 v1(2420,1320)
  Bottom w10: v1(2420,1320) 2420,1425 v1(2505,1510)
U5_VDD: C28.1 R31.1 U5.11 | length 276.3
  Top w8: R31.1@777.13,2840 777.13,2879.13 794,2896 849.5,2896 C28.1@850,2896.5
  Top w10: C28.1@850,2896.5 850,2920 865,2935 925,2935 940,2920 940,2889.53 U5.11@940.47,2889.06
V_CHRGR: C6.1 C7.1 J2.1 Q3.5 Q3.6 Q3.7 Q3.8 VCHRG.P$1 | length 944
  Top w16: Q3.8@3425,2897.44 v2(3425,2955) ; Q3.7@3475,2897.44 v2(3475,2955) ; Q3.6@3525,2897.44 v2(3525,2955) ; Q3.5@3575,2897.44 v2(3575,2955) 3613,2955 3643,2925 C6.1@3738,2925 3739.53,2926.53 C7.1@3739.53,3004
  Top w40: 3451,3085 J2.1@3451,3160
  Top w50: VCHRG.P$1@3350,3005 3405,3005 3451,3050 3451,3085
  Bottom w40: 3451,3085 J2.1@3451,3160
  Bottom w50: VCHRG.P$1@3350,3005 3405,3005 3451,3050 3451,3085
VBAT_SW: C3.1 C5.1 C33.1 L1.2 Q8.5 Q8.6 Q8.7 Q8.8 R30.1 U4.12 U5.9 U5.10 VBAT_SW.P$1 | length 2302.5
  Top w8: U4.12@1124.69,1512.01 1124.69,1494.32 1150,1469 ; L1.2@1275,1506 L1.2@1275,1575
  Top w10: C33.1@952.99,3005 C33.1@965,2987.99 ; U5.10@960.16,2889.06 960.16,2915.16 970,2925 979.84,2915.16 U5.9@979.84,2889.06 ; 1150,1469 1238,1469 L1.2@1275,1506
  Top w12: v5(1471,1757) 1490,1776 R30.1@1490,1840.47
  Top w14: v2(2525,2640) Q8.5@2525,2702.56 ; v2(2575,2640) Q8.6@2575,2702.56 ; v2(2625,2640) Q8.7@2625,2702.56 ; v2(2675,2640) Q8.8@2675,2702.56
  Top w16: C33.1@965,2987.99 970,2980 970,2925
  Top w30: C33.1@965,2987.99 965,3000 v3(1010,3000) ; L1.2@1275,1575 C3.1@1275,1757.01 C5.1@1400,1757.01 v5(1471,1757)
  GND+Signal w30: v3(1010,3000) 1146,2864 1303,2864 v3(1636,2863)
  Bottom w12: v2(2675,2640) 2746,2640 2950,2844 VBAT_SW.P$1@2950,2900
VBATSW_EN: R28.1 U17.46 VBATSWEN.P$1 | length 409.1
  Top w8: U17.46@2221,2458.27 2223,2458 v1(2364,2458)
  Top w10: R28.1@2438.13,2649 2438.13,2611.87 2450,2600 VBATSWEN.P$1@2450,2550
  Bottom w10: v1(2364,2458) 2423,2458 2450,2485 VBATSWEN.P$1@2450,2550
VOUT_BOOST: C21.1 C22.1 Q6.1 Q6.2 Q6.3 R12.1 U4.8 | length 555.2
  Top w8: R12.1@1054.87,1398 R12.1@1055,1397.87
  Top w10: C22.1@995,1388.5 1020.5,1388.5 1030,1398 R12.1@1054.87,1398
  Top w12: Q6.1@820,1485 v1(855,1485) ; Q6.2@820,1535 v1(855,1535) ; Q6.3@820,1585 v1(855,1585) ; C22.1@995,1388.5 993.5,1390 970,1390 950,1410 C21.1@950,1502.01 967.99,1520 995,1520 1028.35,1553.35 U4.8@1105,1553.35
  Top w20: v4(894,1510) 896.01,1510.01 949.99,1510.01 C21.1@950,1502.01
VPP_!MCLR!: PICKIT3.1 R15.2 U17.7 VPP!MCLR!.P$1 VPP!MCLR!.P$2 | length 961.1
  Top w8: 1730,2379.53 1730.47,2379.53 U17.7@1779,2379.53
  Top w10: 1730,2379.53 1633,2379.53 1570,2317 1570,2230 1755,2045 1755,1927.87 R15.2@1757.87,1925
  Top w12: VPP!MCLR!.P$2@1600,1880 1645,1925 R15.2@1757.87,1925
  Bottom w12: PICKIT3.1@1600,1800 VPP!MCLR!.P$2@1600,1880
pads on no net: J2.P1 J2.P2 J3.P1 J3.P2 J4.P1 J4.P2 J5.P1 J5.P2 J6.3 J6.4 J6.P1 J6.P2 PICKIT3.6 U3.1 U3.5 U6.4 U17.5 U17.6 U17.8 U17.11 U17.12 U17.13 U17.21 U17.22 U17.23 U17.28 U17.29 U17.30 U17.31 U17.36 U17.39 U17.40 U17.43 U17.44 U17.45 U17.53 U17.54 U17.55 U17.58 U17.59 U17.60 U17.61 U17.62 U17.63 U17.64

## Polygon pours and split planes (outlines as drawn)
GND on GND+Signal "Polygon_1_Net_GND" (solid, remove dead copper, shelved, pour order 14): 3985,3235 15,3235 15,15 735,15 735,1265 3985,1265
PSW_OUT on PWR+Signal "Polygon_1_Net_PSW_OUT" (solid, remove dead copper, pour order 3): 2469.5,3230.38 2469.5,2894.5 2715.5,2894.5 2715.5,3235.62
5VPIC on PWR+Signal "Polygon_1_Net_5VPIC" (solid, remove dead copper, pour order 9): 1875,2605 2355,2605 2355,1895 1875,1895
VOUT_BOOST on PWR+Signal "Polygon_1_Net_VOUT_BOOST" (solid, remove dead copper, pour order 1): 941,1656 941,1444 769,1444 769,1656
5V on PWR+Signal "Polygon_1_Net_5V" (solid, remove dead copper, pour order 12): 1555.5,1994.5 1555.5,3085.5 1444.5,3085.5 1444.5,2755.5 424.5,2755.5 424.5,1994.5
VBAT_SW on PWR+Signal "Polygon_1_Net_VBAT_SW" (solid, remove dead copper, pour order 11): 1229.5,1955.5 1229.5,1694.5 1835.5,1694.5 1835.5,2644.5 2394.5,2644.5 2394.5,2594.5 2715.5,2594.5 2715.5,2855.5 2430.5,2855.5 2430.5,2905.5 1594.5,2905.5 1594.5,1955.5
L1_OUT on PWR+Signal "Polygon_1_Net_L1_OUT" (solid, remove dead copper, pour order 2): 980,1655 1515,1655 1515,1540 980,1540
U1_CS on PWR+Signal "Polygon_1_Net_U1_CS" (solid, remove dead copper, pour order 4): 3494.5,2155.5 3985.5,2155.5 3985.5,1919.5 3494.5,1919.5
U1_LX on PWR+Signal "Polygon_1_Net_U1_LX" (solid, remove dead copper, pour order 7): 2745,2305 2745,1720 3105,1720 3105,2305
DCIN_S on PWR+Signal "Polygon_1_Net_DCIN_S" (solid, remove dead copper, pour order 10): 3144.5,2825.5 3144.5,1719.5 3455.5,1719.5 3455.5,2594.5 3705.5,2594.5 3705.5,2825.5
PC_PWR_12V on PWR+Signal "Polygon_1_Net_PC_PWR_12V" (solid, remove dead copper, pour order 8): 14.5,1344.5 545.5,1344.5 545.5,1444.5 735.5,1444.5 735.5,1750.5 14.5,1750.5
V_CHRGR on PWR+Signal "Polygon_1_Net_V_CHRGR" (solid, remove dead copper, pour order 5): 3274.5,2864.5 3615.5,2864.5 3615.5,3235.5 3274.5,3235.5
IB_PWR_5V on PWR+Signal "Polygon_1_Net_IB_PWR_5V" (solid, remove dead copper, pour order 6): 385.5,2144.5 385.5,2505.5 14.5,2505.5 14.5,2144.5
BATT+ on PWR+Signal "Polygon_1_Net_BATT+" (solid, remove dead copper, pour order 13): 3494.5,1880.5 3985.5,1880.5 3985.5,1264.5 735.5,1264.5 735.5,869.5 344.5,869.5 344.5,1305.5 584.5,1305.5 584.5,1405.5 989.5,1405.5 989.5,1500.5 2494.5,1500.5 2494.5,2555.5 2754.5,2555.5 2754.5,3235.5 3050.5,3235.5 3050.5,2344.5 2705.5,2344.5 2705.5,1680.5 3494.5,1680.5
PHASE1-2 on Top "Polygon_1_Net_PHASE1-2" (solid, remove dead copper, pour order 0): 995,2947 1122,2947 1122,2878 1033,2878 1033,2908 995,2908

## Keep-outs
Keep-Out Layer:
  the board outline again, w5

## Silkscreen, mask and mechanical layers (free items; w line width, h text height)
Top Overlay:
  region: 1300,3100 1300,3230 1700,3230 1700,3100
  lines w8: 380,3150 460,3060 460,3132 425,3132 425,3168 525,3168 525,3132 490,3132 490,3060 570,3150 475,3230 380,3150
  text "TransTech Systems, Inc" at 595,3193 h54.25
  text "PCB: 1700-0003 REV-A" at 595,3143 h54.25
  text "PCA: 7500-0430 REV-A" at 595,3093 h54.25
Dimension:
  drawing of 301 lines, arcs and shapes, not listed
  text "Layer" at 4620.58,3130 h60
  text "Name" at 5030.49,3130 h60
  text "Material" at 5960.23,3130 h60
  text "Thickness" at 6820,3130 h60
  text "Constant" at 7469.84,3130 h60
  text "Board Layer Stack" at 8039.7,3130 h60
  text "Top Overlay" at 5030.49,3010 h60
  text "Top Solder" at 5030.49,2890 h60
  text "Solder Resist" at 5960.23,2890 h60
  text "0.40mil" at 6820,2890 h60
  text "3.5" at 7469.84,2890 h60
  text "1" at 4620.58,2770 h60
  text "Top" at 5030.49,2770 h60
  text "1.38mil" at 6820,2770 h60
  text "Dielectric 1" at 5030.49,2650 h60
  text "FR-4" at 5960.23,2650 h60
  text "4.33mil" at 6820,2650 h60
  text "4.8" at 7469.84,2650 h60
  text "2" at 4620.58,2530 h60
  text "GND+Signal" at 5030.49,2530 h60
  text "1.38mil" at 6820,2530 h60
  text "Dielectric2" at 5030.49,2410 h60
  text "FR-4" at 5960.23,2410 h60
  text "47.24mil" at 6820,2410 h60
  text "4.8" at 7469.84,2410 h60
  text "3" at 4620.58,2290 h60
  text "PWR+Signal" at 5030.49,2290 h60
  text "1.38mil" at 6820,2290 h60
  text "Dielectric3" at 5030.49,2170 h60
  text "FR-4" at 5960.23,2170 h60
  text "12.60mil" at 6820,2170 h60
  text "4.8" at 7469.84,2170 h60
  text "4" at 4620.58,2050 h60
  text "Bottom" at 5030.49,2050 h60
  text "1.38mil" at 6820,2050 h60
  text "Bottom Solder" at 5030.49,1930 h60
  text "Solder Resist" at 5960.23,1930 h60
  text "0.40mil" at 6820,1930 h60
  text "3.5" at 7469.84,1930 h60
  text "Bottom Overlay" at 5030.49,1810 h60
  text "Total board thickness:" at 4620.58,1690 h60
  text "70.49mil" at 6820,1690 h60
tPlace:
  text "(GND)" at 324.26,128.35 h54.25
Unrouted:
  lines w0: 1778.95,2478 1779,2477.95 ; 1900,1875 1900,1880
ENG_NOTES:
  circle w5: c-185,2436 r24
  text "PANEL" at 1913.39,3405 h108.5
  text "PWR SW" at 2608.05,3405 h108.5
  text "CHARGER" at 3302.44,3405 h108.5
  text "INDICATOR" at 1797.43,3300 h108.5
  text "& LED" at 2639.45,3300 h108.5
  text "POWER" at 3361.01,3300 h108.5
  text "IB+ PWR OUT" at -683.9,2615.18 h108.5
  text "& COMM" at -402,2510.18 h108.5
  text "PANEL PC" at -514.89,1805.18 h108.5
  text "PWR OUT" at -456.75,1700.18 h108.5
  text "PICKIT 3" at 1639.3,1140.18 h108.5
  text "PRGM CONN" at 1607.64,1035.18 h108.5
  text "UPDATE CHECKLIST:" at 950,695.36 h108.5
  text "See Basecamp punch list ..." at 950,590.36 h108.5
  text "BATTERY" at -442.99,542.68 h108.5
  text "https://basecamp.com/2591377/projects/18383547/todolists/67793168" at 950,485.36 h108.5

## Dimensions
4000,1250 to 750,0 on Dimension
4000,3250 to 4000,1250 on Dimension
4000,3250 to 0,3250 on Dimension
800,1500 to 800,0 on tFinish
4000,1450 to 750,1450 on tFinish
-50,0 to -50,3500 on tFinish
0,3550 to 4000,3550 on tFinish

## Text inside footprints (layer, text, board x,y; h text height)
5VON: tPlace "K" at 270,2085 h46.5
12VON: tPlace "K" at 160,1310 h46.5
C3: Measures "0.02in/0.5mm" at 1451,1748 h38.75 r90; Measures "0.126in/3.2mm" at 1124,1684 h38.75 r90; Measures "0.063in/1.6mm" at 1287,2003 h38.75 r90; Measures "Alternate 2 Padstyle: OX90Y60D30P" at 1776,1108 h77.5 r90; Measures "Alternate 1 Padstyle: OX60Y90D30P" at 1676,1108 h77.5 r90; Measures "Default Padstyle: RX33p69Y62p99D0T" at 1576,1085 h77.5 r90
C5: Measures "0.02in/0.5mm" at 1576,1748 h38.75 r90; Measures "0.126in/3.2mm" at 1249,1684 h38.75 r90; Measures "0.063in/1.6mm" at 1412,2003 h38.75 r90; Measures "Alternate 2 Padstyle: OX90Y60D30P" at 1901,1108 h77.5 r90; Measures "Alternate 1 Padstyle: OX60Y90D30P" at 1801,1108 h77.5 r90; Measures "Default Padstyle: RX33p69Y62p99D0T" at 1701,1085 h77.5 r90
C6: tPlace "+" at 3788,2974 h100.75 r270
C17: Measures "0.063in/1.6mm" at 3025,1869 h38.75 r270; Measures "0.299in/7.6mm" at 2925,1756 h38.75 r270; Measures "0.169in/4.3mm" at 3193,1284 h38.75 r270; Measures "0.098in/2.5mm" at 3193,1384 h38.75 r270; Measures "Alt 2 Padstyle: OX90Y60D30P" at 2695,2203 h77.5 r270; Measures "Alt 1 Padstyle: OX60Y90D30P" at 2770,2203 h77.5 r270; Measures "Default Padstyle: RX100p8Y98p42D0T" at 2845,2355 h77.5 r270
C20: Measures "0.063in/1.6mm" at 3546,1405 h38.75; Measures "0.299in/7.6mm" at 3659,1305 h38.75; Measures "0.169in/4.3mm" at 4131,1573 h38.75; Measures "0.098in/2.5mm" at 4031,1573 h38.75; Measures "Alt 2 Padstyle: OX90Y60D30P" at 3212,1075 h77.5; Measures "Alt 1 Padstyle: OX60Y90D30P" at 3212,1150 h77.5; Measures "Default Padstyle: RX100p8Y98p42D0T" at 3060,1225 h77.5
C21: Measures "0.02in/0.5mm" at 1126,1493 h38.75 r90; Measures "0.126in/3.2mm" at 799,1429 h38.75 r90; Measures "0.063in/1.6mm" at 962,1748 h38.75 r90; Measures "Alternate 2 Padstyle: OX90Y60D30P" at 1451,853 h77.5 r90; Measures "Alternate 1 Padstyle: OX60Y90D30P" at 1351,853 h77.5 r90; Measures "Default Padstyle: RX33p69Y62p99D0T" at 1251,830 h77.5 r90
C23: Measures "0.02in/0.5mm" at 472,1806 h38.75 r180; Measures "0.126in/3.2mm" at 536,1479 h38.75 r180; Measures "0.063in/1.6mm" at 217,1642 h38.75 r180; Measures "Alternate 2 Padstyle: OX90Y60D30P" at 1112,2131 h77.5 r180; Measures "Alternate 1 Padstyle: OX60Y90D30P" at 1112,2031 h77.5 r180; Measures "Default Padstyle: RX33p69Y62p99D0T" at 1135,1931 h77.5 r180
C24: Measures "0.02in/0.5mm" at 472,1681 h38.75 r180; Measures "0.126in/3.2mm" at 536,1354 h38.75 r180; Measures "0.063in/1.6mm" at 217,1517 h38.75 r180; Measures "Alternate 2 Padstyle: OX90Y60D30P" at 1112,2006 h77.5 r180; Measures "Alternate 1 Padstyle: OX60Y90D30P" at 1112,1906 h77.5 r180; Measures "Default Padstyle: RX33p69Y62p99D0T" at 1135,1806 h77.5 r180
C25: Measures "0.02in/0.5mm" at 472,1556 h38.75 r180; Measures "0.126in/3.2mm" at 536,1229 h38.75 r180; Measures "0.063in/1.6mm" at 217,1392 h38.75 r180; Measures "Alternate 2 Padstyle: OX90Y60D30P" at 1112,1881 h77.5 r180; Measures "Alternate 1 Padstyle: OX60Y90D30P" at 1112,1781 h77.5 r180; Measures "Default Padstyle: RX33p69Y62p99D0T" at 1135,1681 h77.5 r180
C30: Measures "0.256in/6.502mm" at 1304,2291 h38.75 r90; Measures "0.217in/5.512mm" at 1062,2798 h38.75 r90; Measures "0.217in/5.512mm" at 1062,1884 h38.75 r90; Measures "0.075in/1.905mm" at 872,2200 h38.75 r90; Measures "0.256in/6.502mm" at 772,2291 h38.75 r90; Measures "Alt 2 Padstyle: OX90Y60D30P" at 1630,1867 h77.5 r90; Measures "Alt 1 Padstyle: OX60Y90D30P" at 1554,1867 h77.5 r90; Measures "Default Padstyle: RX89Y219D0T" at 1480,1829 h77.5 r90
C31: Measures "0.256in/6.502mm" at 1604,2291 h38.75 r90; Measures "0.217in/5.512mm" at 1362,2798 h38.75 r90; Measures "0.217in/5.512mm" at 1362,1884 h38.75 r90; Measures "0.075in/1.905mm" at 1172,2200 h38.75 r90; Measures "0.256in/6.502mm" at 1072,2291 h38.75 r90; Measures "Alt 2 Padstyle: OX90Y60D30P" at 1930,1867 h77.5 r90; Measures "Alt 1 Padstyle: OX60Y90D30P" at 1854,1867 h77.5 r90; Measures "Default Padstyle: RX89Y219D0T" at 1780,1829 h77.5 r90
C33: Measures "0.02in/0.5mm" at 962,3181 h38.75 r180; Measures "0.126in/3.2mm" at 1026,2854 h38.75 r180; Measures "0.063in/1.6mm" at 707,3017 h38.75 r180; Measures "Alternate 2 Padstyle: OX90Y60D30P" at 1602,3506 h77.5 r180; Measures "Alternate 1 Padstyle: OX60Y90D30P" at 1602,3406 h77.5 r180; Measures "Default Padstyle: RX33p69Y62p99D0T" at 1625,3306 h77.5 r180
CR1: tPlace "K" at 2535,1795 h77.5 r180; Measures "0.06in/1.52mm" at 2582,1977 h38.75 r180; Measures "0.22in/5.59mm" at 2501,2077 h38.75 r180; Measures "0.115in/2.92mm" at 2069,1837 h38.75 r180; Measures "0.064in/1.63mm" at 2169,1837 h38.75 r180; Measures "Alt 2 Padstyle: OX90Y60D30P" at 2948,2307 h77.5 r180; Measures "Alt 1 Padstyle: OX60Y90D30P" at 2948,2232 h77.5 r180; Measures "Default Padstyle: RX85p84Y64p17D0T" at 3100,2157 h77.5 r180
CR2: tPlace "K" at 2890,2355 h77.5
CR3: tPlace "K" at 3865,2350 h77.5
CR4: tPlace "K" at 3375,1480 h77.5 r90; Measures "0.06in/1.52mm" at 3557,1433 h38.75 r90; Measures "0.22in/5.59mm" at 3657,1514 h38.75 r90; Measures "0.115in/2.92mm" at 3417,1946 h38.75 r90; Measures "0.064in/1.63mm" at 3417,1846 h38.75 r90; Measures "Alt 2 Padstyle: OX90Y60D30P" at 3887,1067 h77.5 r90; Measures "Alt 1 Padstyle: OX60Y90D30P" at 3812,1067 h77.5 r90; Measures "Default Padstyle: RX85p84Y64p17D0T" at 3737,915 h77.5 r90
CR5: tPlace "K" at 3305.91,1985.08 h48.83 r270; Measures "0.114in/2.896mm" at 3559,2197 h38.75 r180; Measures "0.075in/1.905mm" at 3123,2027 h38.75 r180; Measures "0.047in/1.194mm" at 3203,2027 h38.75 r180; Measures "0.033in/0.838mm" at 3620,1921 h38.75 r180; Measures "0.154in/3.912mm" at 3559,1821 h38.75 r180; Measures "Alt 2 Padstyle: OX90Y60D30P" at 3983,2513 h77.5 r180; Measures "Alt 1 Padstyle: OX60Y90D30P" at 3983,2439 h77.5 r180; Measures "Default Padstyle: RX41Y47D0T" at 3999,2363 h77.5 r180
CR6: tPlace "K" at 2765,2785 h54.25 r180
CR7: tPlace "K" at 2915,2760 h54.25 r90
J1: tPlace "2" at 464,817 h77.5 r180; tPlace "1" at 307,818 h77.5 r180
J2: tPlace "2" at 3695,3160 h54.25 r180
J3: tPlace "4" at 2929.13,3058.98 h54.25; tPlace "1" at 2629.13,3058.98 h54.25; tDocu "GOLD_0.76_PLATING_BLACK_COLOUR" at 2104,3554 h77.5; tDocu "HDR_OF_NANOFIT,_SR,_VERTICAL,_CLIP_PWR_CONN_-4_CKT" at 1665,3654 h77.5; tDocu "1053111304" at 2551,3754 h77.5
J4: tPlace "1" at 200,2355 h77.5 r180
J5: tPlace "1" at 170,1675 h77.5 r270
J6: tPlace "2" at 2275,3060 h54.25; tPlace "1" at 1875,3060 h54.25
L1: Measures "0.216in/5.486mm" at 1921,1587 h38.75 r180; Measures "0.208in/5.283mm" at 1499,1247 h38.75 r180; Measures "Alternate 2 Pad Style: OX60Y90D30P" at 2075,2093 h77.5 r180; Measures "Alternate 1 Pad Style: OX60Y90D30P" at 2075,1993 h77.5 r180; Measures "Default Pad Style: RX46Y185D0T" at 1984,1893 h77.5 r180
L2: Measures "0.492in/12.497mm" at 3192,1806 h38.75 r90; Measures "0.492in/12.497mm" at 2714,2205 h38.75 r90; Measures "0.24in/6.096mm" at 2814,2227 h38.75 r90; Measures "0.544in/13.818mm" at 3571,2205 h38.75 r90; Measures "Alternate 2 Pad Style: OX90Y60D30P" at 3836,1640 h77.5 r90; Measures "Alternate 1 Pad Style: OX60Y90D30P" at 3736,1640 h77.5 r90; Measures "Default Pad Style: RX152Y217D0T" at 3636,1708 h77.5 r90
L3: Measures "0.299in/7.595mm" at 1847,2937 h38.75 r180; Measures "0.299in/7.595mm" at 1454,2555 h38.75 r180; Measures "Alt 2 Pad Style: EX90Y60D30P" at 1901,3385 h77.5 r180; Measures "Alt 1 Pad Style: OX60Y90D30P" at 1901,3335 h77.5 r180; Measures "Default Pad Style: RX49p5Y128D0T" at 1984,3285 h77.5 r180
PICKIT3: tPlace "1" at 1515,1795 h54.25
PICPWR: tPlace "K" at 2220,2690 h46.5 r180
Q1: tPlace "1" at 3023,2041 h54.25 r90
Q2: tPlace "1" at 2653,2041 h54.25 r90
Q3: tPlace "1" at 3409,2708 h54.25 r180
Q5: tPlace "1" at 487,2259 h54.25 r270
Q6: tPlace "1" at 805,1450 h54.25 r270; Measures "0.236in/5.994mm" at 864,1804 h38.75 r180; Measures "0.197in/5.004mm" at 470,1572 h38.75 r180; Measures "0.05in/1.27mm" at 1213,1522 h38.75 r180; Measures "0.028in/0.711mm" at 973,1365 h38.75 r180; Measures "0.246in/6.248mm" at 864,1265 h38.75 r180; Measures "Alt 2 Padstyle: OX90Y60D30P" at 1288,2268 h77.5 r180; Measures "Alt 1 Padstyle: OX60Y90D30P" at 1288,2208 h77.5 r180; Measures "Heat Tab Padstyle: RX151Y157D0T" at 1386,2088 h77.5 r180; Measures "Default Padstyle: RX40Y18D0T" at 1304,2028 h77.5 r180
Q8: tPlace "1" at 2691,2892 h54.25
R7: Measures "0.022in/0.559mm" at -102,3210 h38.75 r270; Measures "0.085in/2.159mm" at 218,3241 h38.75 r270; Measures "0.055in/1.397mm" at 58,2920 h38.75 r270; Measures "Alt 2 Padstyle: OX90Y60D30P" at -348,3665 h77.5 r270; Measures "Alt 1 Padstyle: OX60Y90D30P" at -288,3665 h77.5 r270; Measures "Default Padstyle: RX30Y55D0T" at -228,3681 h77.5 r270
R14: Measures "0.022in/0.559mm" at 3745,3026 h38.75 r270; Measures "0.085in/2.159mm" at 4065,3057 h38.75 r270; Measures "0.055in/1.397mm" at 3905,2736 h38.75 r270; Measures "Alt 2 Padstyle: OX90Y60D30P" at 3499,3481 h77.5 r270; Measures "Alt 1 Padstyle: OX60Y90D30P" at 3559,3481 h77.5 r270; Measures "Default Padstyle: RX30Y55D0T" at 3619,3497 h77.5 r270
R17: tDocu "TECONN_2512" at 3537.52,2121.22 h77.5 r270
R18: tDocu "TECONN_2512" at 3732.52,2121.22 h77.5 r270
R19: Measures "0.022in/0.559mm" at 243,1022 h38.75 r180; Measures "0.085in/2.159mm" at 274,702 h38.75 r180; Measures "0.055in/1.397mm" at -47,862 h38.75 r180; Measures "Alt 2 Padstyle: OX90Y60D30P" at 698,1268 h77.5 r180; Measures "Alt 1 Padstyle: OX60Y90D30P" at 698,1208 h77.5 r180; Measures "Default Padstyle: RX30Y55D0T" at 714,1148 h77.5 r180
R51: Measures "0.022in/0.559mm" at 3748,1547 h38.75 r180; Measures "0.085in/2.159mm" at 3779,1227 h38.75 r180; Measures "0.055in/1.397mm" at 3458,1387 h38.75 r180; Measures "Alt 2 Padstyle: OX90Y60D30P" at 4203,1793 h77.5 r180; Measures "Alt 1 Padstyle: OX60Y90D30P" at 4203,1733 h77.5 r180; Measures "Default Padstyle: RX30Y55D0T" at 4219,1673 h77.5 r180
R52: Measures "0.022in/0.559mm" at -102,1138 h38.75 r270; Measures "0.085in/2.159mm" at 218,1169 h38.75 r270; Measures "0.055in/1.397mm" at 58,848 h38.75 r270; Measures "Alt 2 Padstyle: OX90Y60D30P" at -348,1593 h77.5 r270; Measures "Alt 1 Padstyle: OX60Y90D30P" at -288,1593 h77.5 r270; Measures "Default Padstyle: RX30Y55D0T" at -228,1609 h77.5 r270
R53: Measures "0.022in/0.559mm" at 438,247 h38.75 r180; Measures "0.085in/2.159mm" at 469,-73 h38.75 r180; Measures "0.055in/1.397mm" at 148,87 h38.75 r180; Measures "Alt 2 Padstyle: OX90Y60D30P" at 893,493 h77.5 r180; Measures "Alt 1 Padstyle: OX60Y90D30P" at 893,433 h77.5 r180; Measures "Default Padstyle: RX30Y55D0T" at 909,373 h77.5 r180
R54: Measures "0.022in/0.559mm" at 272,1703 h38.75; Measures "0.085in/2.159mm" at 241,2023 h38.75; Measures "0.055in/1.397mm" at 562,1863 h38.75; Measures "Alt 2 Padstyle: OX90Y60D30P" at -183,1457 h77.5; Measures "Alt 1 Padstyle: OX60Y90D30P" at -183,1517 h77.5; Measures "Default Padstyle: RX30Y55D0T" at -199,1577 h77.5
R55: Measures "0.03in/0.762mm" at -106,1325 h38.75 r270; Measures "0.126in/3.2mm" at 222,1361 h38.75 r270; Measures "0.063in/1.6mm" at 58,1042 h38.75 r270; Measures "Alternate 2 Padstyle: OX90Y60D30P" at -432,1937 h77.5 r270; Measures "Alternate 1 Padstyle: OX60Y90D30P" at -332,1937 h77.5 r270; Measures "Default Padstyle: RX44Y63D0T" at -232,1824 h77.5 r270
R57: Measures "0.022in/0.559mm" at 399,1024 h38.75 r270; Measures "0.085in/2.159mm" at 719,1055 h38.75 r270; Measures "0.055in/1.397mm" at 559,734 h38.75 r270; Measures "Alt 2 Padstyle: OX90Y60D30P" at 153,1479 h77.5 r270; Measures "Alt 1 Padstyle: OX60Y90D30P" at 213,1479 h77.5 r270; Measures "Default Padstyle: RX30Y55D0T" at 273,1495 h77.5 r270
U1: tPlace "1" at 2575,1680 h77.5 r90; tDocu "*" at 2596,1642 h77.5; Measures "0.037in/0.94mm" at 2425,1286 h38.75; Measures "0.026in/0.65mm" at 2157,1640 h38.75; Measures "0.289in/7.341mm" at 2936,1538 h38.75; Measures "0.311in/7.899mm" at 2551,1864 h38.75; Measures "0.212in/5.385mm" at 2551,1790 h38.75
U3: tPlace "1" at 2330,1360 h77.5 r180; tDocu "*" at 2366,1366 h77.5 r90; Measures "0.024in/0.61mm" at 2557,1219 h38.75 r90; Measures "0.037in/0.95mm" at 2374,944 h38.75 r90; Measures "0.114in/2.896mm" at 2392,1562 h38.75 r90; Measures "0.11in/2.794mm" at 2153,1262 h38.75 r90; Measures "0.063in/1.6mm" at 2228,1274 h38.75 r90
U4: tPlace "1" at 1185,1640 h54.25
U6: tPlace "1" at 1855,2845 h54.25; Measures "0.024in/0.61mm" at 1626,2990 h38.75 r270; Measures "0.037in/0.95mm" at 1811,3258 h38.75 r270; Measures "0.118in/2.997mm" at 1793,2641 h38.75 r270; Measures "0.118in/2.997mm" at 2034,2954 h38.75 r270; Measures "0.069in/1.753mm" at 1959,2954 h38.75 r270; Measures "Alt 2 Padstyle: OX90Y60D30P" at 1366,3378 h77.5 r270; Measures "Alt 1 Padstyle: OX60Y90D30P" at 1426,3378 h77.5 r270; Measures "Default Padstyle: RX52Y22D0T" at 1546,3394 h77.5 r270
U12: tPlace "1" at 3810,2590 h54.25; Measures "3.740157E-02in/.95mm" at 3766,3136 h38.75 r270; Measures "Alt 2 Padstyle: OX90Y60D30P" at 3275,3123 h77.5 r270; Measures "Alt 1 Padstyle: OX60Y90D30P" at 3350,3123 h77.5 r270; Measures "Pin One Padstyle: RX58Y22D0T" at 3425,3153 h77.5 r270; Measures "Default Padstyle: RX58Y22D0T" at 3500,3139 h77.5 r270
U13: tPlace "1" at 1255,2175 h54.25; Measures "3.740157E-02in/.95mm" at 1211,2721 h38.75 r270; Measures "Alt 2 Padstyle: OX90Y60D30P" at 720,2708 h77.5 r270; Measures "Alt 1 Padstyle: OX60Y90D30P" at 795,2708 h77.5 r270; Measures "Pin One Padstyle: RX58Y22D0T" at 870,2738 h77.5 r270; Measures "Default Padstyle: RX58Y22D0T" at 945,2724 h77.5 r270
U14: tPlace "1" at 2050,1550 h54.25; Measures "3.740157E-02in/.95mm" at 2006,2096 h38.75 r270; Measures "Alt 2 Padstyle: OX90Y60D30P" at 1515,2083 h77.5 r270; Measures "Alt 1 Padstyle: OX60Y90D30P" at 1590,2083 h77.5 r270; Measures "Pin One Padstyle: RX58Y22D0T" at 1665,2113 h77.5 r270; Measures "Default Padstyle: RX58Y22D0T" at 1740,2099 h77.5 r270
U15: tPlace "1" at 795,1895 h54.25; Measures "3.740157E-02in/.95mm" at 751,2441 h38.75 r270; Measures "Alt 2 Padstyle: OX90Y60D30P" at 260,2428 h77.5 r270; Measures "Alt 1 Padstyle: OX60Y90D30P" at 335,2428 h77.5 r270; Measures "Pin One Padstyle: RX58Y22D0T" at 410,2458 h77.5 r270; Measures "Default Padstyle: RX58Y22D0T" at 485,2444 h77.5 r270
U17: tPlace "33" at 2207,2153 h54.25; tPlace "49" at 2159,2559 h54.25; tPlace "17" at 1843,2105 h54.25; tPlace "1" at 1793,2509 h54.25